# Altium PCB nrf_400708.PcbDoc (part 2 of 6)
Units mm, origin at the board's own origin, x right, y up, seen from the top; angles counter-clockwise.
Board outline 117 x 63.5 mm, 4 copper layers (Top Layer, Mid-Layer 1, Mid-Layer 2, Bottom Layer), stack 1.556 mm thick; 226 components, 168 nets, 912 pads, 2002 vias.
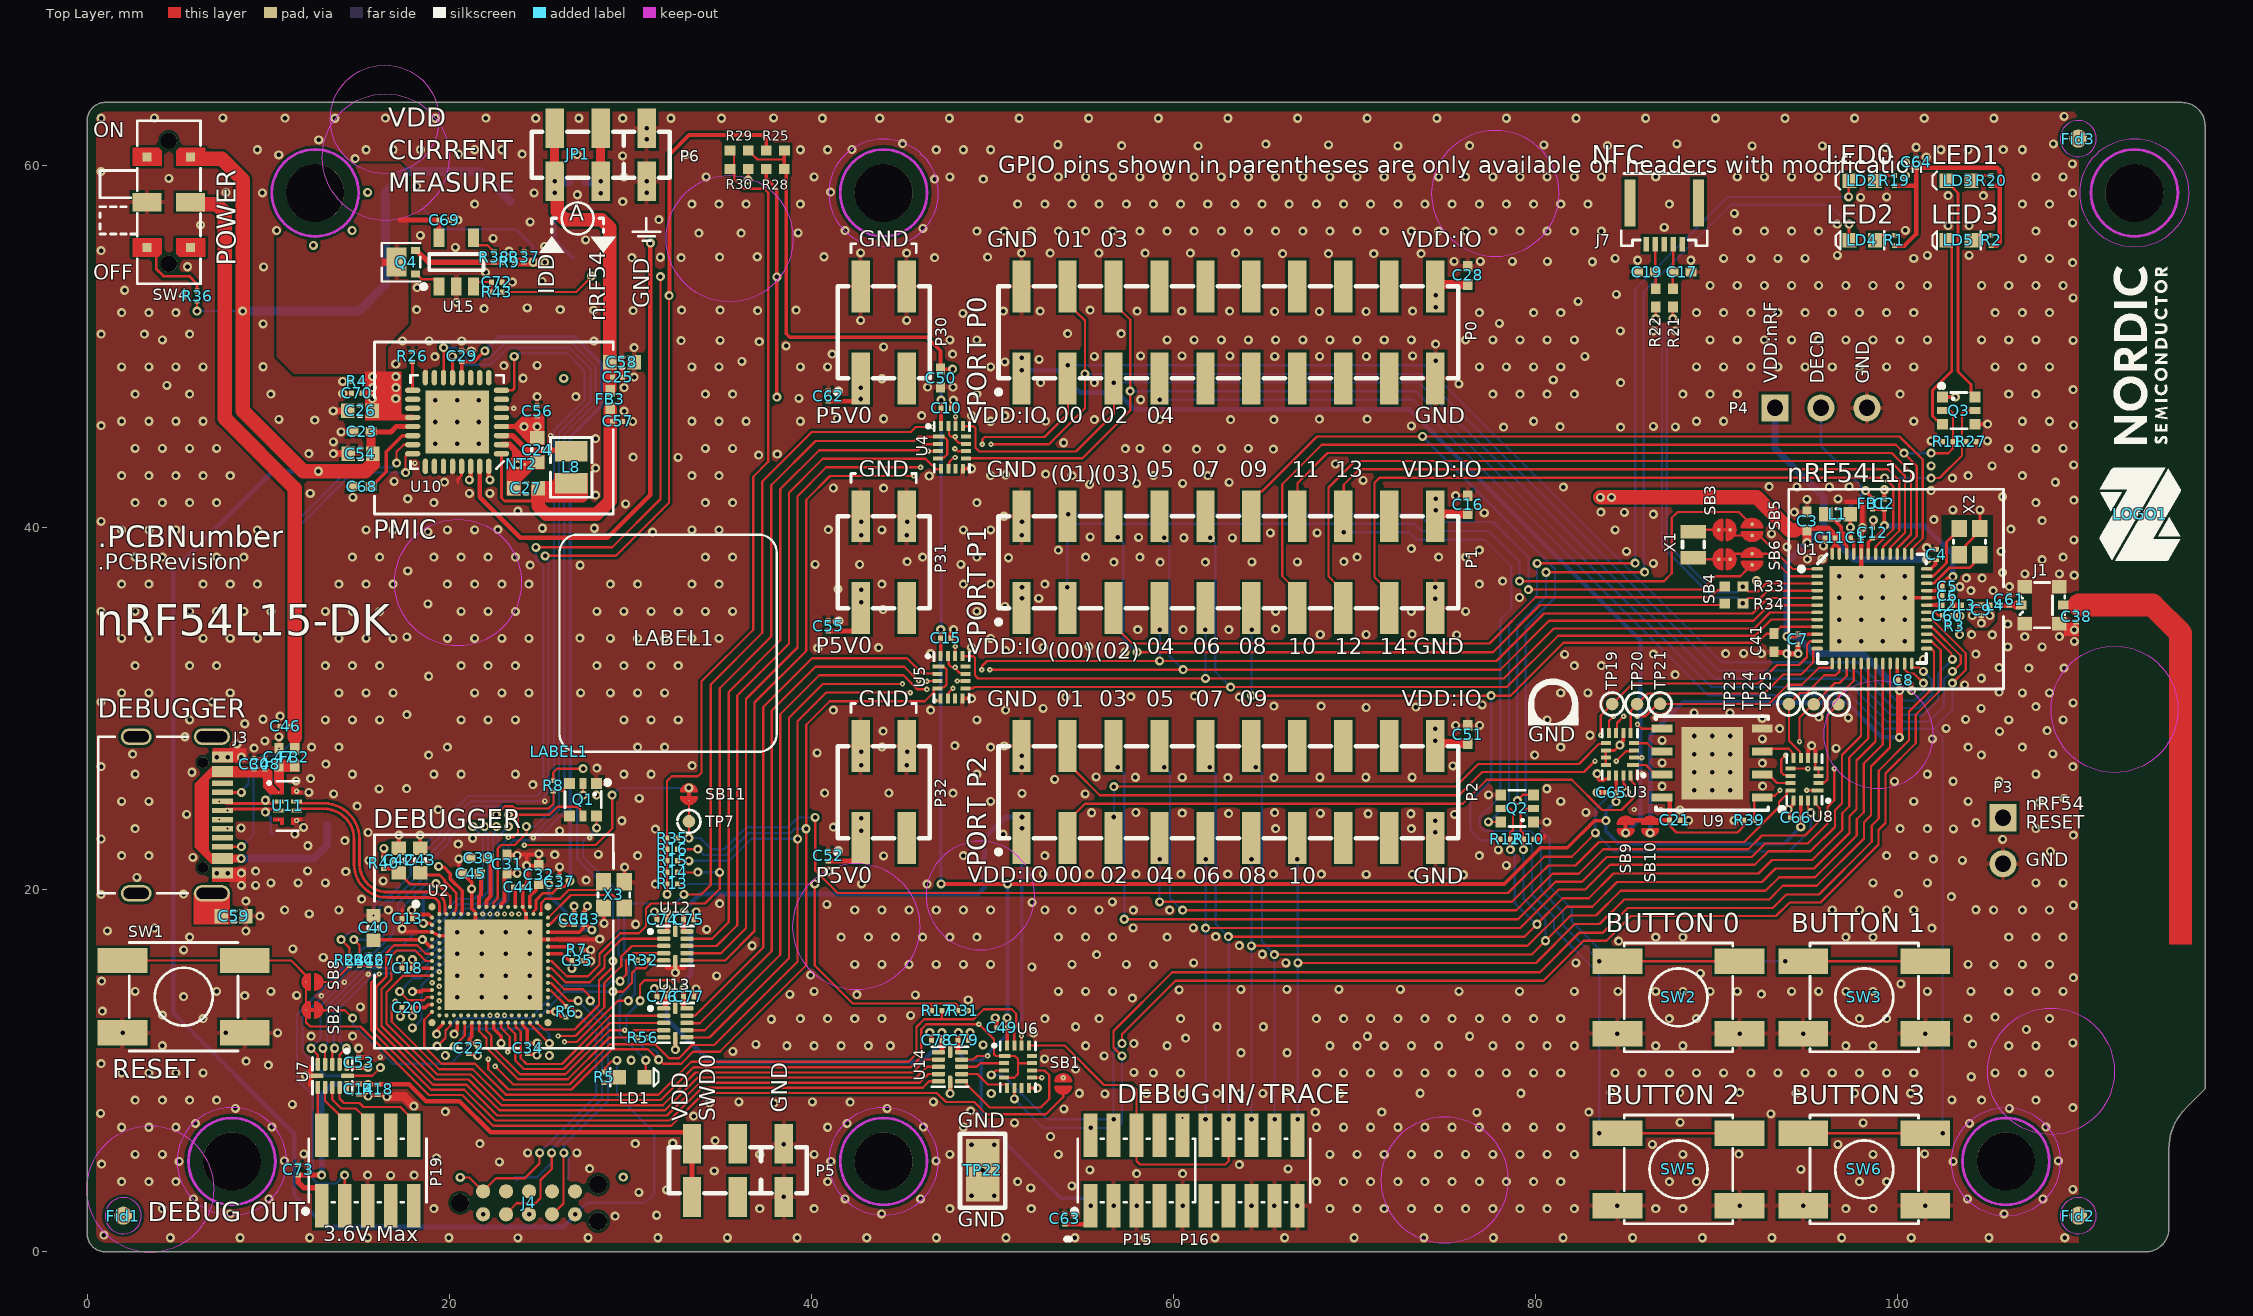
[diagram p0: Top Layer view]

## Part data (continued)
C40: library part C0603-2µ2-6.3V-X7R, "Capacitor, X7R, ±10%, 6.3V", Manufacturer=N.A., Part number NEMS=100200272, Artikkelnr Noca=20039322, Author=rsk, Component Class=Capacitors, Component Status=Active, ComponentLink1Description=Datasheet, ComponentLink1URL=N.A., ComponentLink2Description="Supplier link", ComponentLink2URL=N.A., Footprint Doc=0603, HelpURL=N.A., LatestRevisionDate=2021-07-22, Manufacturer Part Number=N.A., Note=6.3V, Pad Count=2, Part Number=C0603-2µ2-6.3V-X7R, Part number IPS=N.A., Part number Norautron=N.A., PartId=100200272, Published=2009-05-08, Supplier 1=N.A., Supplier 2=N.A., Supplier Part Number 1=N.A., Supplier Part Number 2=N.A.
C41: library part C0402-100n, "Capacitor, X7R, ±10%", Manufacturer=N.A., Part number IPS=00000005296, Part number NEMS=100200184, Artikkelnr Noca=20039200, Author=rsk, Component Class=Capacitors, Component Status=Active, ComponentLink1Description=Datasheet, ComponentLink1URL=N.A., ComponentLink2Description="Supplier link", ComponentLink2URL=N.A., Footprint Doc=0402, HelpURL=N.A., LatestRevisionDate=2009-11-23, Manufacturer Part Number=N.A., Note=16V, Pad Count=2, Part Number=C0402-100n, Part number Norautron=N.A., PartId=100200184, Published=2009-05-08, Supplier 1=N.A., Supplier 2=N.A., Supplier Part Number 1=N.A., Supplier Part Number 2=N.A.
C42 C43 C54 C58: library part C0603-4µ7-10V-X7S, "Capacitor, X7S, ±10%, 10V", Manufacturer=N.A., Part number IPS=00000001779, Part number NEMS=100200351, Supplier Part Number 1=445-14258-1-ND, Artikkelnr Noca=20030013, Author=rsk, Component Class=Capacitors, Component Status=Active, ComponentLink1Description=Datasheet, ComponentLink1URL=N.A., ComponentLink2Description="Supplier link", ComponentLink2URL=N.A., Footprint Doc=0603, HelpURL=N.A., LatestRevisionDate=2016-08-15, Manufacturer Part Number=N.A., Note=10V, Pad Count=2, Part Number=C0603-4µ7-10V-X7S, Part number Norautron=N.A., PartId=100200351, Published=2016-08-15, Supplier 1=Digi-Key, Supplier 2=N.A., Supplier Part Number 2=N.A.
C47: library part C0402-1µ0-16V-X5R, "Capacitor, Ceramic, X5R, ±10%, 16V", Manufacturer=Murata, Manufacturer Part Number=GRT155R61C105KE01D, Part number IPS=N.A., Part number NEMS=100200452, Supplier Part Number 1=490-12255-1-ND, Artikkelnr Noca=N.A., Author=rsk, Component Class=Capacitors, Component Status=Active, ComponentLink1Description=Datasheet, ComponentLink1URL=https://search.murata.co.jp/Ceramy/image/img/A01X/G101/ENG/GRT155R61C105KE01-01.pdf, ComponentLink2Description="Supplier link", ComponentLink2URL=https://www.murata.com/en-global/products/productdetail?partno=GRT155R61C105KE01%23, Footprint Doc=0402, HelpURL=N.A., LatestRevisionDate=2020-12-15, Note=16V, Pad Count=2, Part Number=C0402-1µ0-16V-X5R, Part number Norautron=N.A., PartId=100200452, Published=2020-12-15, Supplier 1=Digi-Key, Supplier 2=Mouser, Supplier Part Number 2=81-GRT155R61C105KE1D
C59: library part C0603-10n-100V-X7R, "Capacitor, X7R, ±10%, 100V", Manufacturer=Murata, Manufacturer Part Number=GCM188R72A103KA37D, Part number IPS=N.A., Part number NEMS=100200349, Supplier Part Number 1=490-4781-1-ND, Artikkelnr Noca=N.A., Author=rsk, Component Class=Capacitors, Component Status=Active, ComponentLink1Description=Datasheet, ComponentLink1URL=N.A., ComponentLink2Description="Supplier link", ComponentLink2URL=N.A., Footprint Doc=0603, HelpURL=http://psearch.en.murata.com/capacitor/product/GCM188R72A103KA37%23.pdf, LatestRevisionDate=2017-08-22, Note=100V, Pad Count=2, Part Number=C0603-10n-100V-X7R, Part number Norautron=N.A., PartId=100200349, Published=2017-08-22, Supplier 1=Digi-Key, Supplier 2=N.A., Supplier Part Number 2=N.A.
C60: library part C0201-3.9p-HQ-Murata, "Capacitor, NP0, ±0.05pF, 25V", Manufacturer=Murata, Manufacturer Part Number=GJM0333C1E3R9WB01, Part number IPS=N.A., Part number NEMS=100200424, Artikkelnr Noca=N.A., Author=rsk, Component Class=Capacitors, Component Status=Active, ComponentLink1Description=Datasheet, ComponentLink1URL=N.A., ComponentLink2Description="Supplier link", ComponentLink2URL=N.A., Footprint Doc=0201, HelpURL=https://psearch.en.murata.com/capacitor/product/GJM0333C1E3R9WB01%23.html, LatestRevisionDate=2019-03-27, Note=25V, Pad Count=2, Part Number=C0201-3.9p-HQ-Murata, Part number Norautron=N.A., PartId=100200424, Published=2019-03-27, Supplier 1=N.A., Supplier 2=N.A., Supplier Part Number 1=N.A., Supplier Part Number 2=N.A.
C61: library part C0201-0.3p-50V-GRM0335C1HR30BA01, "Capacitor, C0G, ±0.1pF, 50V", Manufacturer=Murata, Manufacturer Part Number=GRM0335C1HR30BA01, Part number IPS=N.A., Part number NEMS=100200650, Supplier Part Number 1=490-6135-2-ND, Artikkelnr Noca=N.A., Author=masi, Component Class=Capacitors, Component Status=Active, ComponentLink1Description=Datasheet, ComponentLink1URL=https://www.murata.com/en-global/products/productdetail?partno=GRM0335C1HR30BA01%23, ComponentLink2Description="Supplier link", ComponentLink2URL=N.A., Footprint Doc=0201, HelpURL=N.A., LatestRevisionDate=2024-01-10, Note=50V, Pad Count=2, Part Number=C0201-0.3p-50V-GRM0335C1HR30BA01, Part number Norautron=N.A., PartId=100200650, Published=2024-01-10, Supplier 1=Digi-Key, Supplier 2=Mouser, Supplier Part Number 2=81-GRM0335C1HR30BA1D
FB1: library part FB0201-120R@100M-200mA-BLM03AG121SN1D, "Ferrite Bead, 120 Ohm @ 100MHz, 200mA, 500 mOhm Max", Manufacturer=Murata, Manufacturer Part Number=BLM03AG121SN1D, Part number IPS=N.A., Part number NEMS=100300419, Supplier Part Number 1=490-5622-1-ND, Artikkelnr Noca=N.A., Author=stl1, Component Class=Inductors, Component Status=Active, ComponentLink1Description=Datasheet, ComponentLink1URL=https://www.murata.com/en-eu/products/productdetail?partno=BLM03AG121SN1%23, ComponentLink2Description="Supplier link", ComponentLink2URL=N.A., Footprint Doc=0201, HelpURL=N.A., LatestRevisionDate=2022-02-27, Note="Ferrite Bead", Pad Count=2, Part Number=FB0201-120R@100M-200mA-BLM03AG121SN1D, Part number Norautron=N.A., PartId=100300419, Published=2022-02-27, Supplier 1=Digi-Key, Supplier 2=Mouser, Supplier Part Number 2=81-BLM03AX121SN1D
FB2 FB3: library part FB0402-120R@100M-500mA, "Ferrite Bead, 120 Ohm @ 100MHz, 500mA, 250 mOhm Max", Manufacturer=Murata, Manufacturer Part Number=BLM15AG121SN1D, Part number IPS=00000009954, Part number NEMS=100300099, Part number Norautron=265230631, Supplier Part Number 1=490-1005-1-ND, Artikkelnr Noca=33029317, Author=rsk, Component Class=Inductors, Component Status=Active, ComponentLink1Description=Datasheet, ComponentLink1URL=N.A., ComponentLink2Description="Supplier link", ComponentLink2URL=N.A., Footprint Doc=0402, HelpURL=http://search.murata.co.jp/Ceramy/image/img/PDF/ENG/L0110S0100BLM15A_SN.pdf, LatestRevisionDate=2014-01-10, Note="Chip EMIFIL Inductor Type Chip Ferrite Bead", Pad Count=2, Part Number=FB0402-120R@100M-500mA, PartId=100300099, Published=2011-11-14, Supplier 1=Digi-Key, Supplier 2=Farnell, Supplier Part Number 2=151-5760
Fid1 Fid2 Fid3: library part Fid-Mark, "Fiducial Mark", Manufacturer=N.A., Part number NEMS=100500073, Artikkelnr Noca=N.A., Author=rsk, Component Class=Connectors, Component Status=Active, ComponentLink1Description=Datasheet, ComponentLink1URL=N.A., ComponentLink2Description="Supplier link", ComponentLink2URL=N.A., Footprint Doc=Fiducial, HelpURL=N.A., LatestRevisionDate=2009-12-12, Manufacturer Part Number=N.A., Note=N.A., Pad Count=1, Part Number=Fid-Mark, Part number IPS=N.A., Part number Norautron=N.A., PartId=100500073, Published=2009-12-12, Supplier 1=N.A., Supplier 2=N.A., Supplier Part Number 1=N.A., Supplier Part Number 2=N.A., System=Connector
J1: "Coaxial Connector with Switch", Manufacturer=Murata, Part number IPS=00000009955, Part number NEMS=100500400, Part number Norautron=26030338, Supplier Part Number 1=490-4981-1-ND, Artikkelnr Noca=55029011, Author=rsk, Component Class=Connectors, Component Status=Active, ComponentLink1Description=Datasheet, ComponentLink1URL=N.A., ComponentLink2Description="Supplier link", ComponentLink2URL=N.A., Footprint Doc=COAXIAL-SWF, HelpURL=http://www.murata.com/products/catalog/pdf/o33e.pdf, LatestRevisionDate=2014-04-24, Manufacturer Part Number=MM8130-2600, Note=N.A., Pad Count=3, Part Number=MM8130-2600, PartId=100500400, Published=2014-04-24, Supplier 1=Digi-Key, Supplier 2=Mouser, Supplier Part Number 2=81-MM8130-2600RA2, System=Connector
J3: library part SD-80259-1021, "USB-C Receptacle, 16 Pin, USB 2.0", Manufacturer="Bellweather Electronic Corp.", Part number IPS=N.A., Part number NEMS=100500830, Artikkelnr Noca=N.A., Author=getr, Component Class=Connectors, Component Status=Active, ComponentLink1Description=Datasheet, ComponentLink1URL=\\hizz\pro\app9717\Datasheet\connectors\Bellwether\SD-80259-001_C.pdf, ComponentLink2Description="Supplier link", ComponentLink2URL=N.A., Footprint Doc=SD-80259-001, HelpURL=N.A., LatestRevisionDate=2023-10-30, Manufacturer Part Number=SD-80259-1021, Note=N.A., Pad Count=16, Part Number=SD-80259-1021, Part number Norautron=N.A., PartId=100500830, Published=2023-10-30, Supplier 1=Cabcon, Supplier 2=N.A., Supplier Part Number 1=SD-80259-1021, Supplier Part Number 2=N.A., System=Connector
J4: library part TC2050-IDC-NLFP, "CBL PLUG-OF-NAILS 10-PIN", Manufacturer="Tag-Connect LLC", Part number IPS=N.A., Part number NEMS=100500463, Supplier Part Number 1=TC2050-IDC-NL-ND, Artikkelnr Noca=N.A., Author=rsk, Component Class=Connectors, Component Status=Active, ComponentLink1Description=Datasheet, ComponentLink1URL=N.A., ComponentLink2Description="Supplier link", ComponentLink2URL=N.A., Footprint Doc=TC2050-IDC-NLFP, HelpURL=http://www.tag-connect.com/Materials/TC2050-IDC%20Datasheet.pdf, LatestRevisionDate=2012-11-21, Manufacturer Part Number=TC2050-IDC-NLFP, Note=N.A., Pad Count=10, Part Number=TC2050-IDC-NLFP, Part number Norautron=N.A., PartId=100500463, Published=2012-11-21, Supplier 1=Digi-Key, Supplier 2=N.A., Supplier Part Number 2=N.A., System=Connector
J7: library part FPC_05P-0.5mm-RA-SMD, "0.5mm FPC, 5P,Right Angle SMT,Double Contact,H=1.2mm,White, Tin plated", Manufacturer=WCON, Manufacturer Part Number=5141-05RZDNWR03, Part number IPS=N.A., Part number NEMS=100500528, Artikkelnr Noca=N.A., Author=rsk, Component Class=Connectors, Component Status=Active, ComponentLink1Description=Datasheet, ComponentLink1URL=N.A., ComponentLink2Description="Supplier link", ComponentLink2URL=N.A., Footprint Doc=FPC_05P-0.5mm-RA-SMD, HelpURL=\\hizz\pro\app9717\Datasheet\connectors\W-CON\5141-05RZDNXX02.pdf, LatestRevisionDate=2024-02-02, Note="(Replaced 5141-05RZDNWR02)", Pad Count=7, Part Number=FPC_05P-0.5mm-RA-SMD, Part number Norautron=N.A., PartId=100500528, Published=2015-06-22, Supplier 1=Cabcon, Supplier 2=N.A., Supplier Part Number 1=5141-05RZDNWR03, Supplier Part Number 2=N.A., System=Connector
JP1: library part "SHUNT JUMPER 2.54mm Black Vertical", "Shunt Jumper 2.54mm Black, open top", Manufacturer=WCON, Manufacturer Part Number=3710-6001OS0B05, Part number IPS=N.A., Part number NEMS=100500728, Artikkelnr Noca=N.A., Assembly="Place on P6 pin 2 and 3", Author=masi, Component Class=Connectors, Component Status=Active, ComponentLink1Description=Datasheet, ComponentLink1URL=N.A., ComponentLink2Description="Supplier link", ComponentLink2URL=N.A., Footprint Doc="SHUNT JUMPER 2.54mm", HelpURL=N.A., LatestRevisionDate=2024-08-02, Note=N.A., Pad Count=2, Part Number="SHUNT JUMPER 2.54mm Black Vertical", Part number Norautron=N.A., PartId=100500752, Published=2022-07-01, Supplier 1=Cabcon, Supplier 2=N.A., Supplier Part Number 1=3710-6001OS0B05, Supplier Part Number 2=N.A., System=Connector
L1: library part L0603-4µ7-MLZ1608M4R7WT000, "Inductor, 120mA, ±20%, 0.65R", Manufacturer="TDK Corporation", Manufacturer Part Number=MLZ1608M4R7WT000, Part number IPS=N.A., Part number NEMS=100300440, Supplier Part Number 1=445-6390-2-ND, Artikkelnr Noca=N.A., Author=stl1, Component Class=Inductors, Component Status=Active, ComponentLink1Description=Datasheet, ComponentLink1URL=https://product.tdk.com/en/search/inductor/inductor/smd/info?part_no=MLZ1608M4R7WT000, ComponentLink2Description="Supplier link", ComponentLink2URL=N.A., Footprint Doc=0603, HelpURL=N.A., LatestRevisionDate=2023-05-10, Note="Power Inductor ±20%", Pad Count=2, Part Number=L0603-4µ7-MLZ1608M4R7WT000, Part number Norautron=N.A., PartId=100300440, Published=2023-05-10, Supplier 1=Digi-Key, Supplier 2=Mouser, Supplier Part Number 2=810-MLZ1608M4R7WT000
L2: library part L0201-2n7-HQ-Murata, "Inductor, 600mA, ±0.1ｎH, 120mOhm", Manufacturer=Murata, Manufacturer Part Number=LQP03HQ2N7B02, Part number IPS=00000001753, Part number NEMS=100300214, Part number Norautron=N.A., Supplier Part Number 1=490-13909-1-ND, Artikkelnr Noca=N.A., Author=rsk, Component Class=Inductors, Component Status=Active, ComponentLink1Description=Datasheet, ComponentLink1URL=https://search.murata.co.jp/Ceramy/image/img/P02/JELF243C-0021.pdf, ComponentLink2Description="Supplier link", ComponentLink2URL=N.A., Footprint Doc=0201, HelpURL=https://psearch.en.murata.com/inductor/product/LQP03HQ2N7B02%23.html, LatestRevisionDate=2018-10-23, Note="-55°C ~ 125°C", Pad Count=2, Part Number=L0201-2n7-HQ-Murata, PartId=100300214, Published=2018-10-23, Supplier 1=Digi-Key, Supplier 2=N.A., Supplier Part Number 2=N.A.